# Altium PCB DAP-PCB-REV-3.PcbDoc (part 3 of 5)
Units mm, origin at the board's own origin, x right, y up, seen from the top; angles counter-clockwise.
Board outline 54.75 x 54.75 mm, 6 copper layers (L1 (SIG/PWR), L2 (GND), L3 (SIG), L4 (PWR), L5 (GND), L6 (SIG/PWR)), stack 1.65 mm thick; 309 components, 179 nets, 957 pads, 421 vias.
Unrouted connection lines stored in the file: 36.
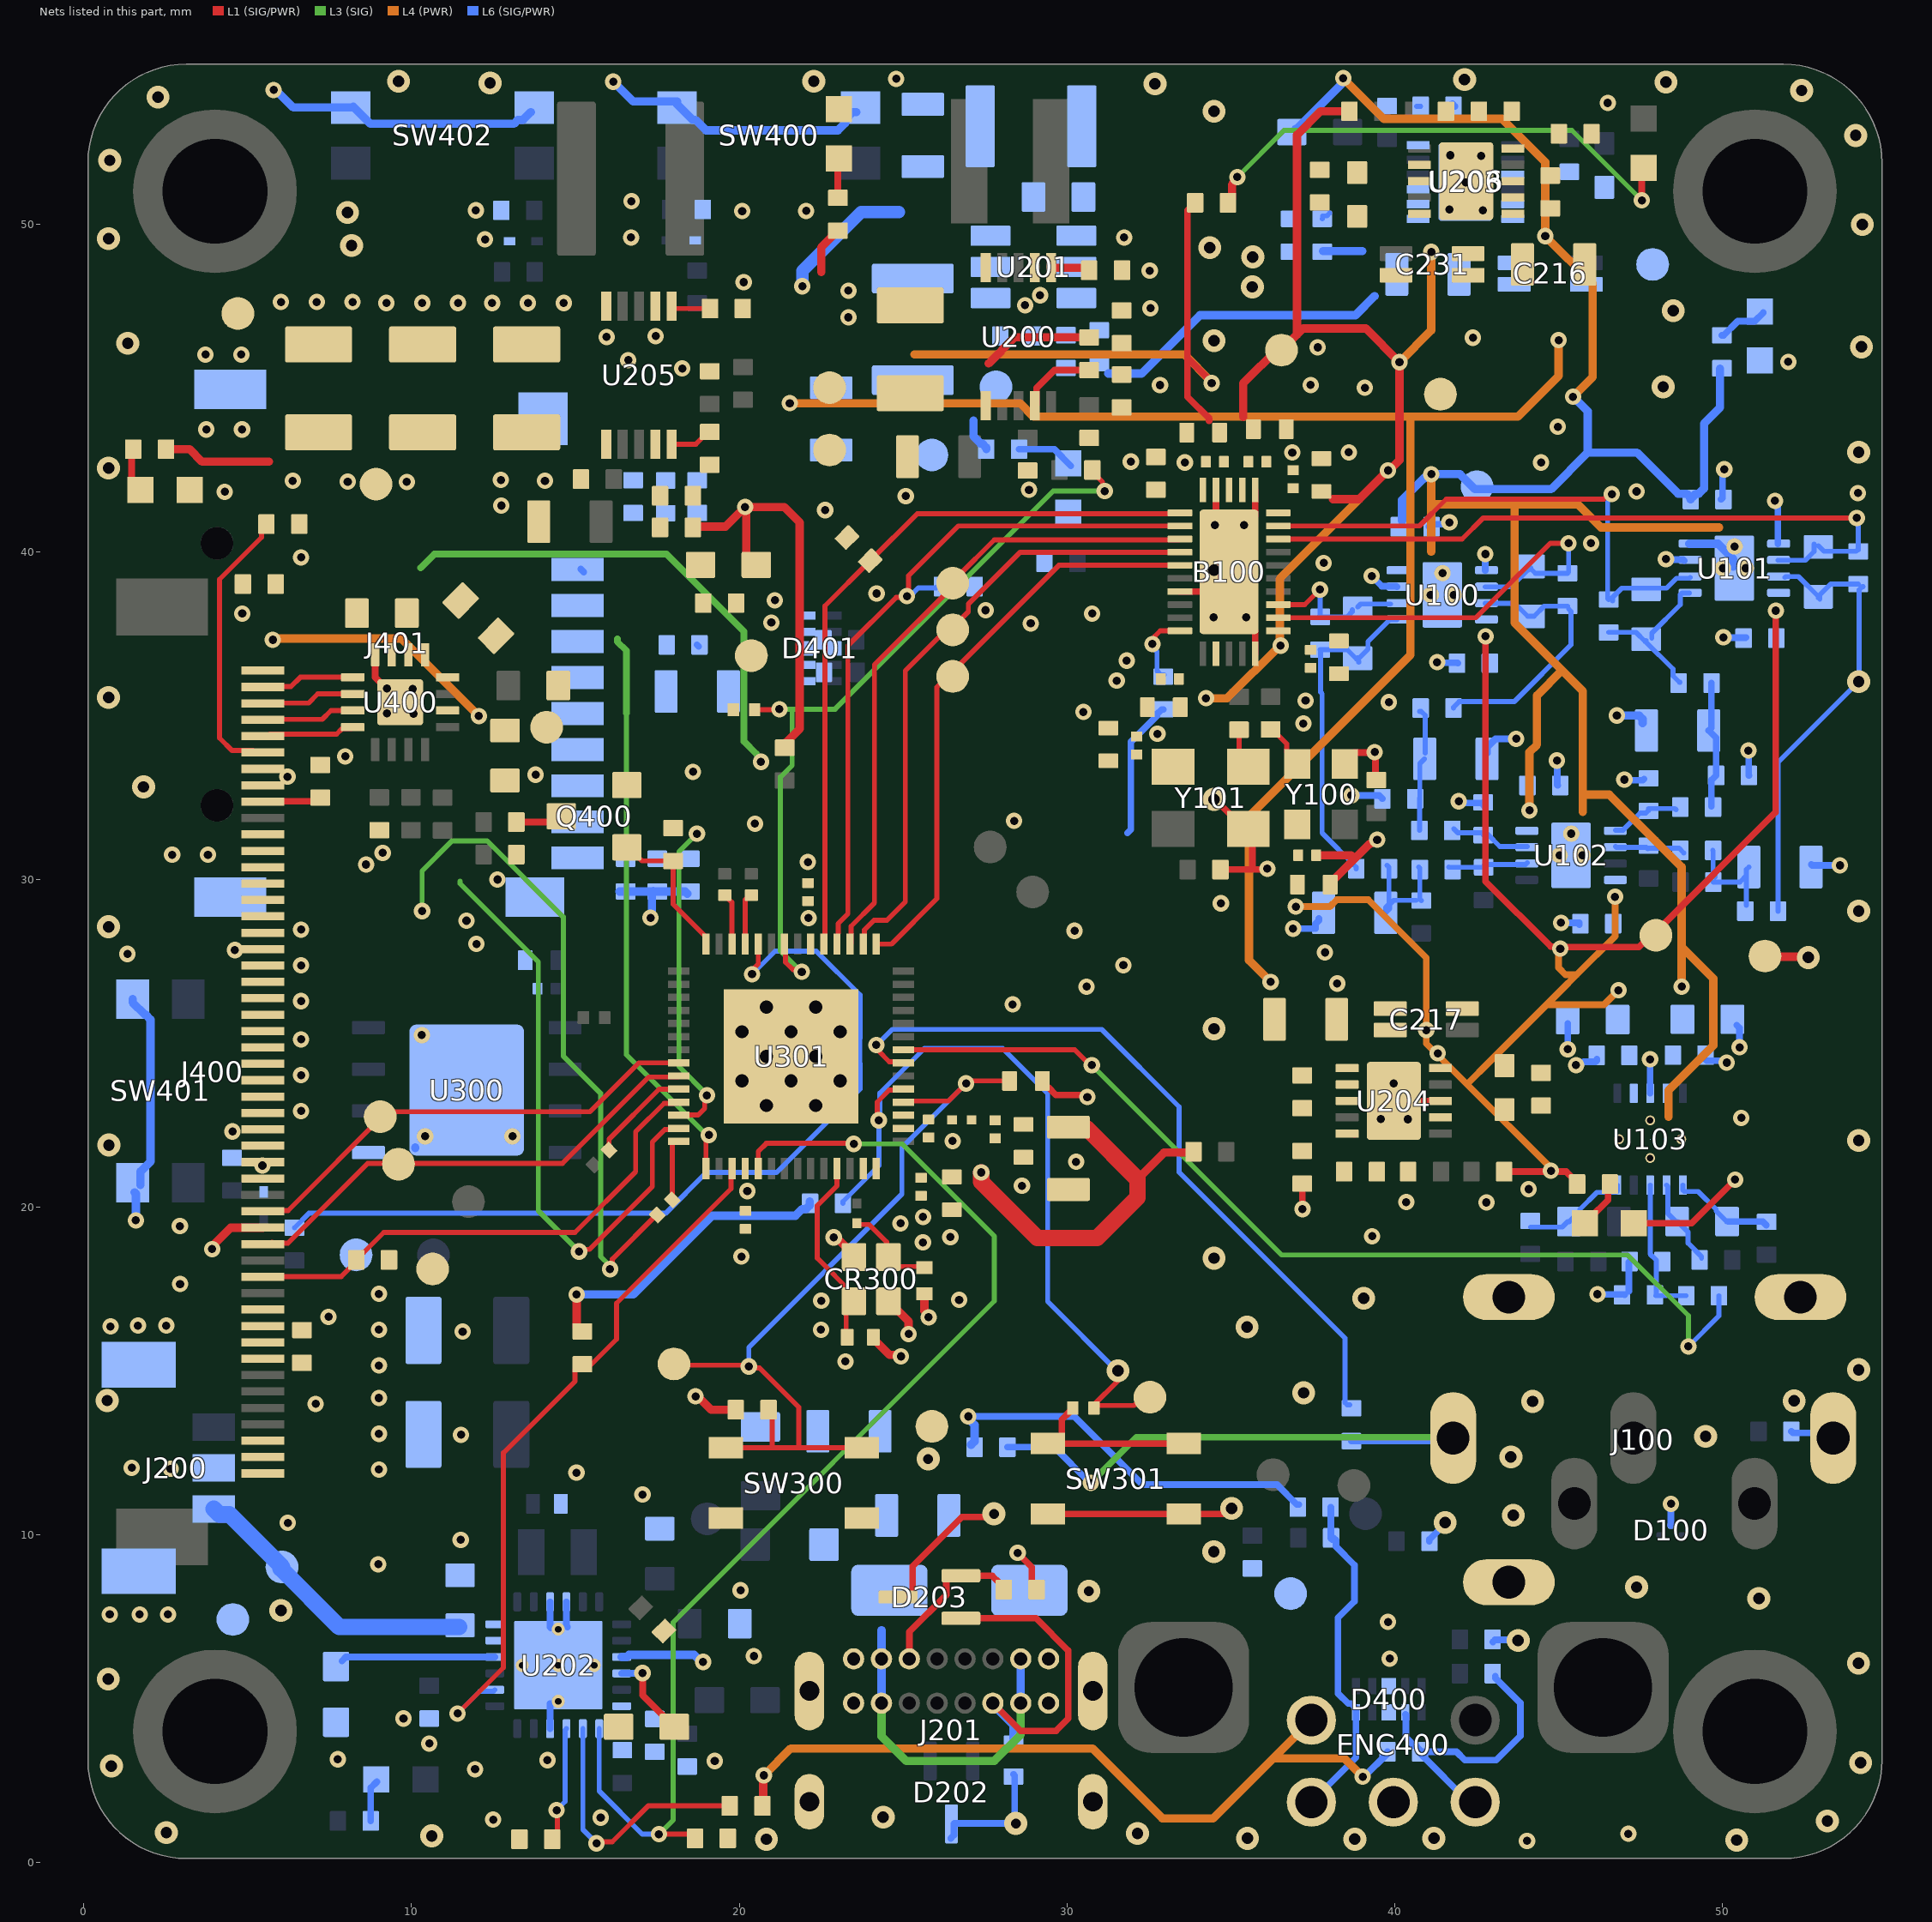
[diagram p6: the nets of this part, all layers, seen from the top]

## Part data (continued)
L201 L202: library part #1-090, <Rating>=400mA, <Tolerance>=0.2, <Value>=22uH, Manufacturer 1="Murata Electronics", Manufacturer Part Number 1=490-LQW32FT220M2HLTR, Supplier Part Number 1=490-LQW32FT220M2HLCT-ND, <Footprint>=1210, <Spec>=810mOhm, <Termination>=SMD, AL-PN=#1-090, Creator Project=DAP, Footprint Status=Verified, Lead Time="25 Weeks", Notes="No 3D", PartType=Inductor, Status=Unverified, SubType=Shielded, Supplier 1=Digikey, Supplier Label="22 µH Shielded Wirewound Inductor 300 mA 810mOhm Max 1210 (3225 Metric)", Type=Standard
L203: library part #1-151, <Rating>=2A, <Tolerance>=0.2, <Value>=1uH, Manufacturer 1="Murata Electronics", Manufacturer Part Number 1=DFE201210U-1R0M=P2, Supplier Part Number 1=490-18104-1-ND, <Spec>=95mOhm, <Termination>=SMD, AL-PN=#1-151, Creator Project=DAP, Footprint Status=Verified, Lead Time="21 Weeks", PartType=Inductor, Status=Unverified, SubType=Shielded, Supplier 1=Digikey, Supplier Label="1 µH Shielded Drum Core, Wirewound Inductor 2 A 95mOhm Max 0805 (2012 Metric)", Type=Standard
L204: library part #1-094, <Rating>=3.7A, <Tolerance>=0.2, <Value>=18uH, Manufacturer 1=Coilcraft, Manufacturer Part Number 1=XGL5050-183MEC, Supplier Part Number 1=2457-XGL5050-183MEC-ND, <Spec>=62.5mOhm, <Termination>=SMD, AL-PN=#1-094, Creator Project=DAP, Footprint Status=Verified, Lead Time=N/A, PartType=Inductor, Status=Unverified, SubType=Shielded, Supplier 1=Digikey, Supplier Label="18 µH Shielded Molded Inductor 4.5 A 62.5mOhm Max Nonstandard", Type=Standard
L300: library part #1-143, <Rating>=600mA, <Value>=2nH, Manufacturer 1="Murata Electronics", Manufacturer Part Number 1=LQP03HQ2N0B02D, Supplier Part Number 1=490-13895-1-ND, <Footprint>=0201, <Spec>=120mOhm, <Termination>=SMD, AL-PN=#1-143, Creator Project=DAP, Footprint Status=Verified, Lead Time="15 Weeks", PartType=Inductor, Status=Unverified, SubType=Shielded, Supplier 1=Digikey, Supplier Label="2 nH Unshielded Thick Film Inductor 600 mA 120mOhm Max 0201 (0603 Metric)", Type=Standard
L301: library part #1-150, <Rating>=140mA, <Tolerance>=0.03, <Value>=24nH, Manufacturer 1="Murata Electronics", Manufacturer Part Number 1=LQP03TN24NH02D, Supplier Part Number 1=490-13004-1-ND, <Footprint>=0201, <Spec>=2.3Ohm, <Termination>=SMD, AL-PN=#1-150, Creator Project=DAP, Footprint Status=Verified, Lead Time="15 Weeks", PartType=Inductor, Status=Unverified, SubType=Shielded, Supplier 1=Digikey, Supplier Label="24 nH Unshielded Thick Film Inductor 140 mA 2.3Ohm Max 0201 (0603 Metric)", Type=Standard
Q400: library part #1-130, <Rating>=2.5Vgs, <Value>=N-Type, Manufacturer 1=MCC, Manufacturer Part Number 1=2N7002-TP, Package="TO-236 MCC", Supplier Part Number 1=2N7002-TPMSCT-ND, <Termination>=SMD, AL-PN=#1-130, Check_prices=https://www.snapeda.com/parts/2N7002-TP/Micro+Commercial/view-part/?ref=eda, Creator Project=DAP, Footprint Status=Verified, Lead Time=N/A, MF="Micro Commercial", MP=2N7002-TP, PartType=Transistor, SnapEDA_Link=https://www.snapeda.com/parts/2N7002-TP/Micro+Commercial/view-part/?ref=snap, Status=Unverified, SubType=MOSFET, Supplier 1=Digikey, Supplier Label="N-Channel 60 V 115mA (Ta) 1.08W Surface Mount SOT-23", Type=Standard
R100 R101 R102 R103 R116 R117 R121 R123 R131 R134: library part #1-105, <Rating>=1/16W, <Tolerance>=0.001, <Value>=499Ohm, Manufacturer 1=YAGEO, Manufacturer Part Number 1=RT0402BRD07499RL, Supplier Part Number 1=YAG1440CT-ND, <Footprint>=0402, <Termination>=SMD, AL-PN=#1-105, Creator Project=DAP, Footprint Status=Verified, Lead Time="23 Weeks", PartType=Resistor, Status=Unverified, Supplier 1=Digikey, Supplier Label="499 Ohms ±0.1% 0.063W, 1/16W Chip Resistor 0402 (1005 Metric) Thin Film", Type=Standard
R104 R105: library part #1-102, <Rating>=1/16W, <Tolerance>=0.01, <Value>=22Ohm, Manufacturer 1=YAGEO, Manufacturer Part Number 1=RC0402FR-0722RL, Supplier Part Number 1=311-22.0LRCT-ND, <Footprint>=0402, <Termination>=SMD, AL-PN=#1-102, Creator Project=DAP, Footprint Status=Verified, Lead Time="22 Weeks", PartType=Resistor, Status=Unverified, Supplier 1=Digikey, Supplier Label="22 Ohms ±1% 0.063W, 1/16W Chip Resistor 0402 (1005 Metric) Moisture Resistant Thick Film", Type=Standard
R106 R107 R111 R112 R113 R119 R129 R135 R208 R209 R210 R211 R216 R221 R223 R242 R300 R301 R400 R401 R402 R403 R404 R405 R406 R407 R408 R412 R413 R414 R415 R416 R417 R418 R419 R422: library part #1-134, <Tolerance>=0.01, <Value>=10kOhm, Manufacturer 1=YAGEO, Manufacturer Part Number 1=AC0402FR-0710KL, Supplier Part Number 1=YAG3436CT-ND, <Footprint>=0402, <Termination>=SMD, AL-PN=#1-134, Creator Project=DAP, Footprint Status=Verified, Lead Time="22 Weeks", PartType=Resistor, Status=Unverified, Supplier 1=Digikey, Supplier Label="10 kOhms ±1% 0.063W, 1/16W Chip Resistor 0402 (1005 Metric) Automotive AEC-Q200, Moisture Resistant Thick Film", Type=Standard
R108 R207 R226 R231 R238 R247: library part #1-138, <Tolerance>=0.001, <Value>=49.9kOhm, Manufacturer 1=YAGEO, Manufacturer Part Number 1=RT0402BRD0749K9L, Supplier Part Number 1=YAG4270CT-ND, <Footprint>=0402, <Termination>=SMD, AL-PN=#1-138, Creator Project=DAP, Footprint Status=Verified, Lead Time="23 Weeks", PartType=Resistor, Status=Unverified, Supplier 1=Digikey, Supplier Label="49.9 kOhms ±0.1% 0.063W, 1/16W Chip Resistor 0402 (1005 Metric) Thin Film", Type=Standard
R114 R115 R126 R133: library part #1-109, <Rating>=1/16W, <Tolerance>=0.001, <Value>=220Ohm, Manufacturer 1=YAGEO, Manufacturer Part Number 1=RT0402BRD07220RL, Supplier Part Number 1=YAG4207CT-ND, <Footprint>=0402, <Termination>=SMD, AL-PN=#1-109, Creator Project=DAP, Footprint Status=Verified, Lead Time="23 Weeks", PartType=Resistor, Status=Unverified, Supplier 1=Digikey, Supplier Label="220 Ohms ±0.1% 0.063W, 1/16W Chip Resistor 0402 (1005 Metric) Thin Film", Type=Standard
R118 R204 R205 R212 R228 R239 R240 R241 R245 R420 R421 R424 R425: library part #1-131, <Tolerance>=0.01, <Value>=100kOhm, Manufacturer 1=YAGEO, Manufacturer Part Number 1=RT0402BRD07100KL, Supplier Part Number 1=YAG1343CT-ND, <Footprint>=0402, <Termination>=SMD, AL-PN=#1-131, Creator Project=DAP, Footprint Status=Verified, Lead Time="23 Weeks", PartType=Resistor, Status=Unverified, Supplier 1=Digikey, Supplier Label="100 kOhms ±0.1% 0.063W, 1/16W Chip Resistor 0402 (1005 Metric) Thin Film", Type=Standard
R120 R122 R124 R132: library part #1-110, <Rating>=1/16W, <Tolerance>=0.001, <Value>=681Ohm, Manufacturer 1=YAGEO, Manufacturer Part Number 1=RT0402BRD07681RL, Supplier Part Number 1=YAG1466CT-ND, <Footprint>=0402, <Termination>=SMD, AL-PN=#1-110, Creator Project=DAP, Footprint Status=Verified, Lead Time="23 Weeks", PartType=Resistor, Status=Unverified, Supplier 1=Digikey, Supplier Label="681 Ohms ±0.1% 0.063W, 1/16W Chip Resistor 0402 (1005 Metric) Thin Film", Type=Standard
R125 R127: library part #1-113, <Rating>=1/16W, <Tolerance>=0.001, <Value>=4.7Ohm, Manufacturer 1=YAGEO, Manufacturer Part Number 1=RT0402BRE074R7L, Supplier Part Number 1=13-RT0402BRE074R7LCT-ND, <Footprint>=0402, <Termination>=SMD, AL-PN=#1-113, Creator Project=DAP, Footprint Status=Verified, Lead Time="23 Weeks", PartType=Resistor, Status=Unverified, Supplier 1=Digikey, Supplier Label="4.7 Ohms ±0.1% 0.063W, 1/16W Chip Resistor 0402 (1005 Metric) Thin Film", Type=Standard
R128 R203 R237: library part #1-079, <Rating>=1/16W, <Tolerance>=0.001, <Value>=54.9kOhm, Manufacturer 1=YAGEO, Manufacturer Part Number 1=RT0402BRD0754K9L, Supplier Part Number 1=YAG1452CT-ND, <Footprint>=0402, <Termination>=SMD, AL-PN=#1-079, Creator Project=DAP, Footprint Status=Verified, Lead Time="20 Weeks", PartType=Resistor, Status=Unverified, Supplier 1=Digikey, Supplier Label="54.9 kOhms ±0.1% 0.063W, 1/16W Chip Resistor 0402 (1005 Metric) Thin Film", Type=Standard
R200: library part #1-074, <Rating>=1/16W, <Tolerance>=0.001, <Value>=220kOhm, Manufacturer 1=YAGEO, Manufacturer Part Number 1=RC0402BR-07220KL, Supplier Part Number 1=13-RC0402BR-07220KLCT-ND, <Footprint>=0402, <Termination>=SMD, AL-PN=#1-074, Creator Project=DAP, Footprint Status=Verified, Lead Time="17 Weeks", PartType=Resistor, Status=Unverified, Supplier 1=Digikey, Supplier Label="220 kOhms ±0.1% 0.063W, 1/16W Chip Resistor 0402 (1005 Metric) Moisture Resistant Thick Film", Type=Standard
R201: library part #1-091, <Rating>=1/16W, <Tolerance>=0.001, <Value>=309kOhm, Manufacturer 1=YAGEO, Manufacturer Part Number 1=RE0402BRE07309KL, Supplier Part Number 1=13-RE0402BRE07309KLCT-ND, <Footprint>=0402, <Termination>=SMD, AL-PN=#1-091, Creator Project=DAP, Footprint Status=Verified, Lead Time="20 Weeks", PartType=Resistor, Status=Unverified, Supplier 1=Digikey, Supplier Label="309 kOhms ±0.1% 0.063W, 1/16W Chip Resistor 0402 (1005 Metric) Thick Film", Type=Standard
R202: library part #1-067, <Rating>=0.1W, <Tolerance>=0.005, <Value>=274kOhm, Manufacturer 1=YAGEO, Manufacturer Part Number 1=RT0603DRE07274KL, Supplier Part Number 1=13-RT0603DRE07274KLCT-ND, <Footprint>=0603, <Termination>=SMD, AL-PN=#1-067, Creator Project=DAP, Footprint Status=Verified, Lead Time="20 Weeks", PartType=Resistor, Status=Unverified, Supplier 1=Digikey, Supplier Label="RES SMD 274K OHM 0.5% 1/10W 0603", Type=Standard
R206 R229 R246 R249 R250 R251 R252 R253 R409 R410 R411: library part #1-043, <Rating>=1/16W, <Tolerance>=0.001, <Value>=1kOhm, Manufacturer 1=YAGEO, Manufacturer Part Number 1=RT0402BRD071KL, Supplier Part Number 1=YAG1386TR-ND, <Footprint>=0402, <Termination>=SMD, AL-PN=#1-043, Creator Project=aRTy, Footprint Status=Verified, Lead Time="20 Weeks", PartType=Resistor, Status=Unverified, Supplier 1=Digikey, Supplier Label="1 kOhms ±0.1% 0.063W, 1/16W Chip Resistor 0402 (1005 Metric) Thin Film", Type=Standard
R213 R224: library part #1-078, <Rating>=1/16W, <Tolerance>=0.001, <Value>=15kOhm, Manufacturer 1=YAGEO, Manufacturer Part Number 1=RT0402BRD0715KL, Supplier Part Number 1=YAG2302CT-ND, <Footprint>=0402, <Termination>=SMD, AL-PN=#1-078, Creator Project=DAP, Footprint Status=Verified, Lead Time="20 Weeks", PartType=Resistor, Status=Unverified, Supplier 1=Digikey, Supplier Label="15 kOhms ±0.1% 0.063W, 1/16W Chip Resistor 0402 (1005 Metric) Thin Film", Type=Standard
R214: library part #1-060, <Rating>=1/16W, <Tolerance>=0.01, <Value>=5kOhm, Manufacturer 1=YAGEO, Manufacturer Part Number 1=RC0402FR-075KL, Supplier Part Number 1=13-RC0402FR-075KLCT-ND, <Footprint>=0402, <Termination>=SMD, AL-PN=#1-060, Creator Project=DAP, Footprint Status=Verified, Lead Time="17 Weeks", PartType=Resistor, Status=Unverified, Supplier 1=Digikey, Supplier Label="5 kOhms ±1% 0.063W, 1/16W Chip Resistor 0402 (1005 Metric) Moisture Resistant Thick Film", Type=Standard
R215: library part #1-061, <Rating>=1/16W, <Tolerance>=0.005, <Value>=9.88kOhm, Manufacturer 1=YAGEO, Manufacturer Part Number 1=RT0402DRD079K88L, Supplier Part Number 1=311-2214-1-ND, <Footprint>=0402, <Termination>=SMD, AL-PN=#1-061, Creator Project=DAP, Footprint Status=Verified, Lead Time="20 Weeks", PartType=Resistor, Status=Unverified, Supplier 1=Digikey, Supplier Label="9.88 kOhms ±0.5% 0.063W, 1/16W Chip Resistor 0402 (1005 Metric) Thin Film", Type=Standard
R217: library part #1-065, <Rating>=0.1W, <Tolerance>=0.01, <Value>=270Ohm, Manufacturer 1=YAGEO, Manufacturer Part Number 1=RC0603FR-07270RL, Supplier Part Number 1=311-270HRCT-ND, <Footprint>=0603, <Termination>=SMD, AL-PN=#1-065, Creator Project=DAP, Footprint Status=Verified, Lead Time="17 Weeks", PartType=Resistor, Status=Unverified, Supplier 1=Digikey, Supplier Label="270 Ohms ±1% 0.1W, 1/10W Chip Resistor 0603 (1608 Metric) Moisture Resistant Thick Film", Type=Standard
R218: library part #1-064, <Rating>=0.1W, <Tolerance>=0.001, <Value>=500Ohm, Manufacturer 1=YAGEO, Manufacturer Part Number 1=RT0603BRC07500RL, Supplier Part Number 1=13-RT0603BRC07500RLCT-ND, <Footprint>=0603, <Termination>=SMD, AL-PN=#1-064, Creator Project=DAP, Footprint Status=Verified, Lead Time="20 Weeks", PartType=Resistor, Status=Unverified, Supplier 1=Digikey, Supplier Label="500 Ohms ±0.1% 0.1W, 1/10W Chip Resistor 0603 (1608 Metric) Thin Film", Type=Standard
R219: library part #1-087, <Rating>=1/16W, <Tolerance>=0.01, <Value>=88.7kOhm, Manufacturer 1=YAGEO, Manufacturer Part Number 1=RC0402FR-0788K7L, Supplier Part Number 1=311-88.7KLRCT-ND, <Footprint>=0402, <Termination>=SMD, AL-PN=#1-087, Creator Project=DAP, Footprint Status=Verified, Lead Time="17 Weeks", PartType=Resistor, Status=Unverified, Supplier 1=Digikey, Supplier Label="88.7 kOhms ±1% 0.063W, 1/16W Chip Resistor 0402 (1005 Metric) Moisture Resistant Thick Film", Type=Standard
R220: library part #1-086, <Rating>=1/10W, <Tolerance>=0.001, <Value>=135kOhm, Manufacturer 1=YAGEO, Manufacturer Part Number 1=RT0603BRD07135KL, Supplier Part Number 1=13-RT0603BRD07135KLCT-ND, <Footprint>=0603, <Termination>=SMD, AL-PN=#1-086, Creator Project=DAP, Footprint Status=Verified, Lead Time="20 Weeks", PartType=Resistor, Status=Unverified, Supplier 1=Digikey, Supplier Label="135 kOhms ±0.1% 0.1W, 1/10W Chip Resistor 0603 (1608 Metric) Thin Film", Type=Standard
R222 R243: library part #1-083, <Rating>=1/16W, <Tolerance>=0.01, <Value>=909kOhm, Manufacturer 1=YAGEO, Manufacturer Part Number 1=RC0402FR-07909KL, Supplier Part Number 1=YAG2377CT-ND, <Footprint>=0402, <Termination>=SMD, AL-PN=#1-083, Creator Project=DAP, Footprint Status=Verified, Lead Time="17 Weeks", PartType=Resistor, Status=Unverified, Supplier 1=Digikey, Supplier Label="909 kOhms ±1% 0.063W, 1/16W Chip Resistor 0402 (1005 Metric) Moisture Resistant Thick Film", Type=Standard
R225 R244: library part #1-084, <Rating>=1/16W, <Tolerance>=0.001, <Value>=90.9kOhm, Manufacturer 1=YAGEO, Manufacturer Part Number 1=RT0402BRD0790K9L, Supplier Part Number 1=YAG1489CT-ND, <Footprint>=0402, <Termination>=SMD, AL-PN=#1-084, Creator Project=DAP, Footprint Status=Verified, Lead Time="20 Weeks", PartType=Resistor, Status=Unverified, Supplier 1=Digikey, Supplier Label="90.9 kOhms ±0.1% 0.063W, 1/16W Chip Resistor 0402 (1005 Metric) Thin Film", Type=Standard
R227: library part #1-149, <Rating>=1/4W, <Tolerance>=0.01, <Value>=0.5Ohms, Manufacturer 1=YAGEO, Manufacturer Part Number 1=PT0805FR-7W0R5L, Supplier Part Number 1=13-PT0805FR-7W0R5LCT-ND, <Footprint>=0805, <Termination>=SMD, AL-PN=#1-149, Creator Project=DAP, Footprint Status=Verified, Lead Time="20 Weeks", PartType=Resistor, Status=Unverified, Supplier 1=Digikey, Supplier Label="500 mOhms ±1% 0.25W, 1/4W Chip Resistor 0805 (2012 Metric) Automotive AEC-Q200, Current Sense, Moisture Resistant Thick Film", Type=Standard
R230: library part #1-088, <Rating>=1/16W, <Tolerance>=0.01, <Value>=15.4kOhm, Manufacturer 1=YAGEO, Manufacturer Part Number 1=RT0402BRD0715K4L, Supplier Part Number 1=YAG4177CT-ND, <Footprint>=0402, <Termination>=SMD, AL-PN=#1-088, Creator Project=DAP, Footprint Status=Verified, Lead Time="20 Weeks", PartType=Resistor, Status=Unverified, Supplier 1=Digikey, Supplier Label="15.4 kOhms ±0.1% 0.063W, 1/16W Chip Resistor 0402 (1005 Metric) Thin Film", Type=Standard
R232 R233 R248: library part #1-085, <Rating>=1/16W, <Tolerance>=0.001, <Value>=33.2kOhm, Manufacturer 1=YAGEO, Manufacturer Part Number 1=RT0402BRD0733K2L, Supplier Part Number 1=YAG4244CT-ND, <Footprint>=0402, <Termination>=SMD, AL-PN=#1-085, Creator Project=DAP, Footprint Status=Verified, Lead Time="20 Weeks", PartType=Resistor, Status=Unverified, Supplier 1=Digikey, Supplier Label="33.2 kOhms ±0.1% 0.063W, 1/16W Chip Resistor 0402 (1005 Metric) Thin Film", Type=Standard
R234 R235: library part #1-024, <Rating>=1/16W, <Tolerance>=0.001, <Value>=5.1kOhm, Manufacturer 1=YAGEO, Manufacturer Part Number 1=RT0402BRE075K1L, Supplier Part Number 1=YAG4404TR-ND, <Footprint>=0402, <Termination>=SMD, AL-PN=#1-024, Creator Project=aRTy, Footprint Status=Verified, Lead Time="20 Weeks", PartType=Resistor, Status=Unverified, Supplier 1=Digikey, Supplier Label="5.1 kOhms ±0.1% 0.063W, 1/16W Chip Resistor 0402 (1005 Metric) Thin Film", Type=Standard
R236: library part #1-095, <Rating>=1/10W, <Tolerance>=0.001, <Value>=172kOhm, Manufacturer 1=YAGEO, Manufacturer Part Number 1=RT0603BRD07172KL, Supplier Part Number 1=13-RT0603BRD07172KLCT-ND, <Footprint>=0603, <Termination>=SMD, AL-PN=#1-095, Creator Project=DAP, Footprint Status=Verified, Lead Time="20 Weeks", PartType=Resistor, Status=Unverified, Supplier 1=Digikey, Supplier Label="172 kOhms ±0.1% 0.1W, 1/10W Chip Resistor 0603 (1608 Metric) Thin Film", Type=Standard
R302: library part #1-147, <Rating>=1/20W, <Tolerance>=0.01, <Value>=1kOhm, Manufacturer 1=YAGEO, Manufacturer Part Number 1=RC0201FR-071KL, Supplier Part Number 1=311-1KMCT-ND, <Footprint>=0201, <Termination>=SMD, AL-PN=#1-147, Creator Project=DAP, Footprint Status=Verified, Lead Time="24 Weeks", PartType=Resistor, Status=Unverified, Supplier 1=Digikey, Supplier Label="1 kOhms ±1% 0.05W, 1/20W Chip Resistor 0201 (0603 Metric) Moisture Resistant Thick Film", Type=Standard
R303: library part #1-148, <Rating>=1/20W, <Tolerance>=0.01, <Value>=1MOhm, Manufacturer 1=YAGEO, Manufacturer Part Number 1=RC0201FR-071ML, Supplier Part Number 1=311-1MMCT-ND, <Footprint>=0201, <Termination>=SMD, AL-PN=#1-148, Creator Project=DAP, Footprint Status=Verified, Lead Time="24 Weeks", PartType=Resistor, Status=Unverified, Supplier 1=Digikey, Supplier Label="1 MOhms ±1% 0.05W, 1/20W Chip Resistor 0201 (0603 Metric) Moisture Resistant Thick Film", Type=Standard
R304 R305 R306 R307 R308: library part #1-146, <Rating>=1/20W, <Tolerance>=0.01, <Value>=22Ohm, Manufacturer 1=YAGEO, Manufacturer Part Number 1=RC0201FR-0722RL, Supplier Part Number 1=YAG2518CT-ND, <Footprint>=0201, <Termination>=SMD, AL-PN=#1-146, Creator Project=DAP, Footprint Status=Verified, Lead Time="24 Weeks", PartType=Resistor, Status=Unverified, Supplier 1=Digikey, Supplier Label="22 Ohms ±1% 0.05W, 1/20W Chip Resistor 0201 (0603 Metric) Moisture Resistant Thick Film", Type=Standard
R423: library part #1-133, <Tolerance>=0.01, <Value>=32.4kOhm, Manufacturer 1=YAGEO, Manufacturer Part Number 1=RC0402FR-0732K4L, Supplier Part Number 1=YAG3119CT-ND, <Footprint>=0402, <Termination>=SMD, AL-PN=#1-133, Creator Project=DAP, Footprint Status=Verified, Lead Time="22 Weeks", PartType=Resistor, Status=Unverified, Supplier 1=Digikey, Supplier Label="32.4 kOhms ±1% 0.063W, 1/16W Chip Resistor 0402 (1005 Metric) Moisture Resistant Thick Film", Type=Standard
SW300 SW301: library part #1-115, <Value>=SPST, Manufacturer 1=C&K, Manufacturer Part Number 1="PTS810SJM250SMTR LFS", Package=None, Supplier Part Number 1=CKN10502CT-ND, <Footprint>=Vert, <Termination>=SMD, AL-PN=#1-115, Check_prices=https://www.snapeda.com/parts/PTS810%20SJM%20250%20SMTR%20LFS/C%2526K/view-part/?ref=eda, Creator Project=DAP, Footprint Status=Verified, Lead Time="16 Weeks", MF=C&K, MP="PTS810 SJM 250 SMTR LFS", PartType=Switch, SnapEDA_Link=https://www.snapeda.com/parts/PTS810%20SJM%20250%20SMTR%20LFS/C%2526K/view-part/?ref=snap, Status=Unverified, SubType=Tacticle, Supplier 1=Digikey, Supplier Label="Tactile Switch SPST-NO Top Actuated Surface Mount", Type=Standard
SW400 SW401 SW402: library part #1-114, <Value>=SPST, Manufacturer 1=E-Switch, Manufacturer Part Number 1=TL1014BF220QG, Supplier Part Number 1=141-TL1014BF220QGCT-ND, <Footprint>=R/A, <Termination>=SMD, AL-PN=#1-114, Creator Project=DAP, Footprint Status=Verified, Lead Time="7 Weeks", PartType=Switch, Status=Unverified, SubType=Tacticle, Supplier 1=Digikey, Supplier Label="Tactile Switch SPST-NO Side Actuated Surface Mount, Right Angle", Type=Standard
U100 U101 U102: library part #1-104, Manufacturer 1="Texas Instruments", Manufacturer Part Number 1=OPA1612AIDRGR, Supplier Part Number 1=296-38367-1-ND, <Termination>=SMD, AL-PN=#1-104, Creator Project=DAP, Footprint Status=Verified, Lead Time="16 Weeks", PartType=IC, Status=Unverified, SubType=Op-Amp, Supplier 1=Digikey, Supplier Label="Audio Amplifier 2 Circuit Rail-to-Rail 8-SON (3x3)", Type=Standard
U103: library part #1-056, Manufacturer 1="Texas Instruments", Manufacturer Part Number 1=OPA1622IDRCR, Package="VSON-10 Texas Instruments", Supplier Part Number 1=296-45038-1-ND, <Termination>=SMD, AL-PN=#1-056, Check_prices=https://www.snapeda.com/parts/OPA1622IDRCR/Texas+Instruments/view-part/?ref=eda, Creator Project=DAP, Footprint Status=Verified, Lead Time="16 Weeks", MF="Texas Instruments", MP=OPA1622IDRCR, PartType=IC, SnapEDA_Link=https://www.snapeda.com/parts/OPA1622IDRCR/Texas+Instruments/view-part/?ref=snap, Status=Unverified, SubType=Op-Amp, Supplier 1=Digikey, Supplier Label="Audio Amplifier 2 Circuit 10-VSON (3x3)", Type=Standard
U200 U205: library part #1-050, Manufacturer 1="Analog Devices", Manufacturer Part Number 1=LTC3440EMS#TRPBF, Package="MSOP-10 Linear Technology", Supplier Part Number 1=LTC3440EMS#TRPBFCT-ND, <Termination>=SMD, AL-PN=#1-050, Check_prices=https://www.snapeda.com/parts/LTC3440EMS%23TRPBF/Analog+Devices/view-part/?ref=eda, Creator Project=DAP, Footprint Status=Verified, Lead Time="21 Weeks", MF="Analog Devices", MP=LTC3440EMS#TRPBF, PartType=IC, SnapEDA_Link=https://www.snapeda.com/parts/LTC3440EMS%23TRPBF/Analog+Devices/view-part/?ref=snap, Status=Unverified, SubType=Buck-Boost, Supplier 1=Digikey, Supplier Label="Buck-Boost Switching Regulator IC Positive Adjustable 2.5V 1 Output 600mA 10-TFSOP, 10-MSOP (0.118\", 3.00mm Width)", Type=Standard
U201: library part #1-089, Manufacturer 1="Analog Devices", Manufacturer Part Number 1=LT3462AES6#TRPBF, Manufacturer_Name="Analog Devices Inc", Manufacturer_Part_Number=LT3093EDD#TRPBF, Supplier Part Number 1=LT3462AES6#TRPBFCT-ND, <Termination>=SMD, AL-PN=#1-089, Copyright="Copyright (C) 2026 Ultra Librarian. All rights reserved.", Creator Project=DAP, Footprint Status=Verified, Lead Time="10 Weeks", PartType=IC, RefDes=RefDes, Status=Unverified, SubType=Regulator, Supplier 1=Digikey, Supplier Label="Cuk Switching Regulator IC Negative Adjustable -1.265V 1 Output 250mA SOT-23-6 Thin, TSOT-23-6", Type=Standard
U202: library part #1-054, Manufacturer 1="Texas Instruments", Manufacturer Part Number 1=BQ24250RGET, Package="VQFN-24 Texas Instruments", Supplier Part Number 1=296-36180-1-ND, <Termination>=SMD, AL-PN=#1-054, Check_prices=https://www.snapeda.com/parts/BQ24250RGET/Texas+Instruments/view-part/?ref=eda, Creator Project=DAP, Footprint Status=Verified, Lead Time="16 Weeks", MF="Texas Instruments", MP=BQ24250RGET, PartType=IC, SnapEDA_Link=https://www.snapeda.com/parts/BQ24250RGET/Texas+Instruments/view-part/?ref=snap, Status=Unverified, SubType=Charger, Supplier 1=Digikey, Supplier Label="Charger IC Lithium Ion 24-VQFN (4x4)", Type=Standard
U203: library part #1-052, Manufacturer 1="Analog Devices", Manufacturer Part Number 1=LT3093EDD#TRPBF, Manufacturer_Name="Analog Devices Inc", Supplier Part Number 1=505-LT3093EDD#TRPBFCT-ND, <Termination>=SMD, AL-PN=#1-052, Copyright="Copyright (C) 2026 Ultra Librarian. All rights reserved.", Creator Project=DAP, Footprint Status=Verified, Lead Time="21 Weeks", Manufacturer_Part_Number=LT3093EDD#TRPBF, PartType=IC, RefDes=RefDes, Status=Unverified, SubType=LDO, Supplier 1=Digikey, Supplier Label="Linear Voltage Regulator IC Negative Adjustable 1 Output 200mA 12-DFN (3x3)", Type=Standard
U204 U206: library part #1-051, Manufacturer 1="Analog Devices", Manufacturer Part Number 1=LT3042EDD#PBF, Package="DFN-10 Linear Technology", Supplier Part Number 1=505-LT3042EDD#PBF-ND, <Termination>=SMD, AL-PN=#1-051, Check_prices=https://www.snapeda.com/parts/LT3042EDD%23PBF/Analog+Devices/view-part/?ref=eda, Creator Project=DAP, Footprint Status=Verified, Lead Time="21 Weeks", MF="Analog Devices", MP=LT3042EDD#PBF, PartType=IC, SnapEDA_Link=https://www.snapeda.com/parts/LT3042EDD%23PBF/Analog+Devices/view-part/?ref=snap, Status=Unverified, SubType=LDO, Supplier 1=Digikey, Supplier Label="Linear Voltage Regulator IC Positive Adjustable 1 Output 200mA 10-DFN (3x3)", Type=Standard
U300: library part #1-124, <Rating>=133MHz, <Value>=64Bit, Manufacturer 1="Gigadevice Electronics Singapore PTE.LTD.", Manufacturer Part Number 1=GD25B64EWIGR, Supplier Part Number 1=1970-GD25B64EWIGRCT-ND, <Termination>=SMD, AL-PN=#1-124, Creator Project=DAP, Footprint Status=Verified, Lead Time=N/A, PartType=IC, Status=Unverified, SubType=FLASH, Supplier 1=Digikey, Supplier Label="FLASH - NOR (SLC) Memory IC 64Mbit SPI - Quad I/O 133 MHz 7 ns 8-WSON (5x6)", Type=Standard
U301: library part #1-055, Manufacturer 1="Espressif Technologies", Package=None, Supplier Part Number 1=1965-ESP32-S3-ND, <Termination>=SMD, AL-PN=#1-055, Availability="In Stock", Check_prices=https://www.snapeda.com/parts/ESP32-S3/Espressif+Systems/view-part/?ref=eda, Creator Project=DAP, Footprint Status=Verified, Lead Time="8 Weeks", Manufacturer Part Number 1=ESP32-S3, MF="Espressif Systems", MP=ESP32-S3, PartType=MCU, Price=None, Purchase-URL=https://pricing.snapeda.com/search/part/ESP32-S3/?ref=eda, SnapEDA_Link=https://www.snapeda.com/parts/ESP32-S3/Espressif+Systems/view-part/?ref=snap, Status=Unverified, SubType=ESP-32, Supplier 1=Digikey, Supplier Label="IC RF TxRx + MCU Bluetooth, WiFi 802.11b/g/n, Bluetooth v5.0 2.412GHz ~ 2.484GHz 56-VFQFN Exposed Pad", Type=Standard
U400: library part #1-128, Manufacturer 1="Rohm Semiconductor", Manufacturer Part Number 1=BD1604MUV-E2, Manufacturer_Name="ROHM Semiconductor", Supplier Part Number 1=BD1604MUV-E2CT-ND, <Termination>=SMD, AL-PN=#1-128, Copyright="Copyright (C) 2025 Ultra Librarian. All rights reserved.", Creator Project=DAP, Footprint Status=Verified, Lead Time="12 Weeks", Manufacturer_Part_Number=BD1604MUV-E2, Notes="Very slightly off", PartType=IC, RefDes=RefDes, Status=Unverified, SubType="LED Driver", Supplier 1=Digikey, Supplier Label="LED Driver IC 4 Output DC DC Regulator Switched Capacitor (Charge Pump) Dimming 30mA VQFN016V3030", Type=Standard
Y100: library part #1-100, <Rating>=2.2mA, <Value>=22.5792MHz, Manufacturer 1="ECS Inc.", Manufacturer Part Number 1=ECS-2520MVLC-225.792-CN-TR, Package=None, Supplier Part Number 1=50-ECS-2520MVLC-225.792-CN-TRCT-ND, <Termination>=SMD, AL-PN=#1-100, Availability=Unavailable, Creator Project=DAP, Footprint Status=Verified, Lead Time="19 Weeks", MP=ASTX-H11-24.576MHZ-T, PartType=Oscillator, Price=None, Status=Unverified, SubType=Crystal, Supplier 1=Digikey, Supplier Label="22.5792 MHz XO (Standard) CMOS Oscillator 1.6V ~ 3.6V Enable/Disable 4-SMD, No Lead", Type=Standard
Y101: library part #1-101, <Rating>=5.5mA, <Value>=24.576MHz, Manufacturer 1="Abracon LLC", Manufacturer Part Number 1=ASTX-H11-24.576MHZ-T, Package=None, Supplier Part Number 1=535-12038-1-ND, <Termination>=SMD, AL-PN=#1-101, Availability=Unavailable, Creator Project=DAP, Footprint Status=Verified, Lead Time="16 Weeks", MP=ASTX-H11-24.576MHZ-T, PartType=Oscillator, Price=None, Status=Unverified, SubType=Crystal, Supplier 1=Digikey, Supplier Label="24.576 MHz TCXO HCMOS Oscillator 3.3V Enable/Disable 4-SMD, No Lead", Type=Standard

## Free pads (board coordinates)
  round 5 hole 3.2: ""(4,4) ""(4,51) ""(51,4) ""(51,51)

## Via types
v1: diameter 0.5, hole 0.25, L1 (SIG/PWR) to L6 (SIG/PWR), tented both sides, 335 vias
v2: diameter 0.7, hole 0.35, L1 (SIG/PWR) to L6 (SIG/PWR), tented both sides, 69 vias
v3: diameter 0.7, hole 0.3, L1 (SIG/PWR) to L6 (SIG/PWR), tented both sides, 6 vias
v4: diameter 1.25, hole 0.75, L1 (SIG/PWR) to L6 (SIG/PWR), 6 vias
v5: diameter 0.4/0.4/0.4/0.4/0.4/0.4 (per signal layer), hole 0.2, L1 (SIG/PWR) to L6 (SIG/PWR), tented both sides, 5 vias

## Nets (pads, with @x,y where several pads share a name; then routed paths per layer and width w, separated by ;. In a path a pad name is that pad's centre, name@x,y a point inside that pad or via, vN(x,y) a via of type N, cw(c..) or ccw(c..) an arc to the next point about the centre after c; other vN are vias at no path point)
22.5792_OUT: R104.1 Y100.3 | length 1.3
  L1 (SIG/PWR) w0.152: R104.1@36.22,34.577 36.27,34.577 36.709,34.138 36.709,33.898 36.723,33.884 Y100.3@37.059,33.884
24.576_OUT: R105.2 Y101.3 | length 1.4
  L1 (SIG/PWR) w0.152: R105.2@35.255,34.569 35.255,33.35 Y101.3@35.433,33.35
40MHz_IN: C308.1 CR300.1 L301.1 | length 2.5
  L1 (SIG/PWR) w0.152: L301.1@23.597,19.512 23.637,19.471 23.963,19.471 24.499,18.935 24.499,18.809 CR300.1@24.486,18.796 ; CR300.1@24.553,18.48 24.847,18.186 C308.1@25.607,18.186
40MHz_OUT: C310.1 CR300.3 U301.53 | length 5.8
  L1 (SIG/PWR) w0.152: U301.53@22.984,21.178 22.984,20.649 22.381,20.047 22.381,18.445 23.495,17.332 CR300.3@23.495,17.145 ; C310.1@23.266,16.205 23.266,16.906 CR300.3@23.505,17.145
+3V3_ANALOG: C102.2 C103.2 C104.2 C105.2 C109.2 C111.2 C126.2 C128.2 C129.2 C217.3 R222.2 R251.2 TP205.1 U100.8 U101.8 U102.8 U103.2 U204.10 Y100.4 Y101.4 | length 51.6
  L1 (SIG/PWR) w0.203: v1@42.799,37.414 42.778,37.394 42.778,29.942 44.774,27.946 45.052,27.946 45.06,27.939 47.463,27.939 47.871,28.346 47.93,28.346 51.638,32.055 v1(51.638,38.202) ; R222.2@43.35,21.082 45.245,21.082 45.499,20.828 R251.2@45.669,20.828 ; v1@46.677,29.413 v1@46.711,29.413
  L4 (PWR) w0.203: v1(36.99,29.171) 38.032,29.171 38.24,29.379 39.201,29.379 40.97,27.61 v1(40.97,25.4) 40.97,24.994 42.215,23.749 ; v1@44.68,21.206 v1(44.776,21.111) ; v1@44.719,21.245 42.215,23.749 ; v1(45.06,27.889) 45.009,27.838 45.009,27.305 45.225,27.089 45.555,27.089 ; v1@46.733,29.487 46.733,28.268 45.555,27.089 ; v1@46.812,26.619 46.812,26.594 46.393,26.175 44.64,26.175 ; 42.215,23.749 42.926,24.46 44.64,26.175 ; 44.64,26.175 45.085,26.619 45.555,27.089
  other v1: 41.319,24.692 46.838,26.619 46.733,29.47 42.778,37.419
+3V3_DAC: B100.1 B100.10 B100.12 B100.27 C112.2 C113.2 C114.2 C115.2 C116.2 C119.2 C120.2 C121.2 C231.3 R243.2 TP206.1 U206.10 | length 33.9
  L1 (SIG/PWR) w0.254: 35.382,44.12 35.382,45.136 TP206.1@36.474,46.228 ; TP206.1@36.551,46.152 37.023,46.625 ; 38.125,41.605 38.926,41.605 v1(39.802,42.481) ; R243.2@38.71,53.442 37.744,53.442 37.023,52.721 37.023,46.625 ; v1@39.827,42.469 40.153,42.794 v1(40.153,45.785) 39.126,46.812 37.211,46.812 37.023,46.625
  L4 (PWR) w0.254: v1(34.248,35.527) 34.892,35.527 36.5,37.135 36.5,39.179 v1@39.802,42.481 ; v1(40.153,45.785) 41.123,46.755 41.123,49.174 v1@41.148,49.2
  other v1: 36.525,37.135 41.123,49.149
+3V3_DIG: B100.13 C122.2 C139.2 C225.2 C227.2 C228.2 C229.2 C300.2 C301.2 C303.2 C304.2 C305.2 C306.2 C307.2 C407.2 C408.2 C409.2 ENC400.4 J400.7 J400.8 J400.35 J400.40 J400.41 J400.42 J401.4 L300.2 R118.2 R208.2 R209.2 R210.2 R211.2 R223.2 R236.2 R241.2 R242.2 R253.2 R300.2 R301.2 R405.2 R407.2 R414.2 R415.2 R416.2 R417.2 R418.2 R419.2 SW400.2 SW400.4 SW401.2 SW401.4 SW402.2 SW402.4 TP203.1 U205.6 U301.20 U301.46 U301.55 U301.56 | length 119.9
  L1 (SIG/PWR) w0.203: R242.2@33.866,50.648 33.866,50.598 33.68,50.412 33.68,45.921 ; 34.341,43.993 34.341,44.069 33.68,44.729 33.68,45.921 ; v1(34.421,45.144) 34.421,45.181 33.68,45.921
  L1 (SIG/PWR) w0.254: R253.2@2.565,43.104 2.591,43.129 3.226,43.129 3.607,42.748 5.652,42.748 ; v1(3.912,18.72) 3.959,18.767 3.959,18.853 4.479,19.373 J400.35@5.461,19.373 ; v1(15.038,17.332) 15.038,16.701 15.042,16.698 15.042,16.327 R210.2@15.113,16.256 ; C225.2@18.618,40.767 19.582,40.767 v1(20.18,41.365) ; v1(18.669,14.224) 18.736,14.224 19.142,13.818 R300.2@19.896,13.818 ; R236.2@20.498,39.802 20.283,39.802 20.213,39.872 20.213,41.331 v1(20.18,41.365) ; R209.2@20.71,1.727 20.732,1.748 20.732,2.698 v1@20.777,2.743 ; R241.2@21.438,34.188 21.844,34.595 21.844,40.894 21.373,41.365 v1(20.18,41.365) ; 32.156,20.853 32.969,21.666 R223.2@33.833,21.666
  L1 (SIG/PWR) w0.508: v1(27.387,21.059) 27.387,20.771 29.101,19.057 30.919,19.057 32.156,20.295 32.156,20.853 C304.2@30.607,22.403
  L4 (PWR) w0.254: v1(20.753,2.659) 21.573,3.48 30.785,3.48 32.918,1.346 34.468,1.346 36.297,3.175 ; 25.349,46.025 33.577,46.025 34.421,45.181 v1(34.421,45.144) ; ENC400.4@37.465,4.242 37.363,4.242 36.297,3.175 ; v1@38.989,2.667 38.98,2.667 38.472,3.175 36.297,3.175
  L6 (SIG/PWR) w0.203: v1(26.992,13.612) 30.228,13.612 32.309,11.532 36.413,11.532 37.023,10.922 R405.2@37.084,10.922 ; v1@39.091,2.634 39.784,3.328 R407.2@39.784,3.378
  L6 (SIG/PWR) w0.254: SW401.2@1.487,26.346 1.487,26.246 1.86,25.873 1.883,25.873 2.032,25.724 2.032,21.391 1.727,21.086 SW401.4@1.727,20.676 ; SW401.4@1.549,20.447 1.585,20.411 v1(1.585,19.595) ; v1(5.793,54.09) 5.86,54.09 6.395,53.555 SW402.4@8.147,53.555 ; SW402.4@8.222,53.58 8.742,53.061 13.126,53.061 13.247,53.182 13.406,53.182 SW402.2@13.64,53.416 ; v1(15.038,17.332) 16.773,17.332 19.177,19.736 21.717,19.736 21.925,19.944 22.042,19.944 22.149,20.051 R301.2@22.149,20.168 ; v1(16.156,54.344) 16.761,53.74 18.104,53.74 18.104,53.655 18.577,53.182 18.662,53.182 18.986,52.857 23.012,52.857 23.231,53.076 23.231,53.182 23.465,53.416 SW400.2@23.571,53.416 ; R419.2@16.35,29.632 R418.2@17.374,29.632 ; v1(17.295,28.831) 17.334,28.87 17.334,29.603 R418.2@17.374,29.642 ; R418.2@17.334,29.628 18.352,29.628 R415.2@18.415,29.566 ; v1(26.992,13.612) 26.992,13.546 27.182,13.356 27.182,12.848 27.085,12.751 R118.2@27.076,12.751
  other v1: 39.03,2.617 7.466,16.653 20.248,20.489 22.116,28.822 6.212,33.137 9.853,42.13 8.052,42.139 6.375,42.164
+3V9: C204.2 C211.2 C220.2 C232.2 L201.1 R200.2 R225.2 R244.2 R250.2 TP209.1 U200.6 U201.6 U204.1 U204.2 U206.1 U206.2 | length 53.8
  L1 (SIG/PWR) w0.254: 22.504,48.539 22.504,49.292 22.839,49.627 22.839,49.677 22.962,49.8 R250.2@23.012,49.8 ; 27.61,45.745 28.407,46.542 30.54,46.542 R200.2@30.582,46.584
  L4 (PWR) w0.254: v1(21.544,44.531) 28.57,44.531 28.981,44.12 40.488,44.12 ; v1(36.22,26.873) 35.56,27.534 35.56,31.925 40.488,36.853 40.488,44.12 ; v1(45.009,46.457) 45.009,45.364 43.764,44.12 40.488,44.12
  L6 (SIG/PWR) w0.381: v1(21.925,48.103) 21.925,48.569 23.724,50.368 24.874,50.368
+LED: C400.2 C413.2 J400.1 TP406.1 U400.6 | length 7.3
  L4 (PWR) w0.254: v1(5.766,37.313) 5.803,37.35 9.692,37.35 v1@12.04,35.002
  other v1: 12.054,34.988
-3V3: C108.2 C110.2 C125.2 C134.2 C135.2 C216.3 R220.2 R252.2 TP207.1 U100.4 U100.9 U101.4 U101.9 U102.4 U102.9 U103.4 U103.11 U203.11 U203.12 | length 76.4
  L4 (PWR) w0.254: v1@38.456,54.432 38.456,54.431 39.673,53.213 43.282,53.213 44.602,51.892 v1(44.602,49.632) 46.05,48.184 46.05,45.33 v1(45.451,44.731) 45.45,44.729 v1@45.415,44.729 ; 41.123,40.005 v1(41.123,42.367) ; 41.148,41.449 43.663,41.449 ; v1(44.12,32.106) 44.12,33.884 44.348,34.112 44.348,35.611 45.116,36.378 ; 45.745,32.055 45.745,32.588 ; 48.362,22.758 48.362,23.558 49.733,24.93 49.733,26.972 48.765,27.94 ; v1@48.743,26.721 48.765,26.744 48.765,27.94 ; 49.911,40.742 46.301,40.742 45.594,41.449 43.663,41.449 ; 43.663,41.449 43.663,37.831 45.116,36.378 ; 45.116,36.378 45.745,35.748 45.745,32.588 ; 45.745,32.588 46.558,32.588 48.765,30.381 48.765,27.94
  L6 (SIG/PWR) w0.254: R220.2@36.982,52.908 37.021,52.908 38.388,54.276 38.388,54.404 v1(38.435,54.451) ; C108.2@40.234,40.945 40.234,41.58 40.898,42.244 40.933,42.244 41.084,42.395 v1@41.084,42.43 ; v1(41.123,42.367) 41.998,42.367 42.455,41.91 44.78,41.91 45.898,43.028 ; v1@45.509,44.679 45.898,44.29 45.898,43.028 ; U101.4@49,40.241 49.877,40.241 50.343,39.776 U101.9@50.343,39.548 ; C110.2@49.04,41.596 49.04,41.646 48.917,41.769 48.655,41.769 47.396,43.028 45.898,43.028 ; C110.2@49.115,41.683 49.201,41.769 49.288,41.769 49.448,41.928 49.448,43.911 49.936,44.399 R252.2@49.936,45.583
  other v1: 48.765,26.727
-3V9: C205.2 C206.2 C218.2 L202.2 R201.2 R219.2 R249.2 TP208.1 U203.1 U203.2 | length 11.4
  L6 (SIG/PWR) w0.254: 27.153,43.998 27.153,43.518 27.369,43.302 27.419,43.302 27.542,43.179 R249.2@27.542,43.129 ; 31.267,45.441 32.283,45.441 34.061,47.219 38.811,47.219 39.395,47.803 ; R219.2@37.821,49.174 39.016,49.174
ADDR_DAC: B100.25 R135.1 | length 2.2
  L1 (SIG/PWR) w0.152: v1(32.614,37.186) 32.68,37.252 32.68,37.418 32.848,37.586 B100.25@33.452,37.586
  L6 (SIG/PWR) w0.152: v1(32.614,37.186) 32.614,37.092 32.75,36.955 32.75,36.361 32.865,36.246 R135.1@32.969,36.246
BAT+: C215.2 J200.1 TP210.1 U202.11 U202.12 | length 9
  L6 (SIG/PWR) w0.508: J200.1@3.964,10.79 4.129,10.624 4.438,10.624 TP210.1@6.045,9.017 ; TP210.1@6.005,8.977 7.794,7.188 C215.2@11.455,7.188
BOOT0: R301.1 R302.1 TP300.1 U301.5 | length 24.2
  L1 (SIG/PWR) w0.152: v1(24.258,22.649) 24.216,22.691 24.216,23.204 24.581,23.569 24.975,23.569 U301.5@25.009,23.603 ; v2@31.572,14.961 31.572,14.714 30.803,13.945 32.054,13.945 32.308,14.199 TP300.1@32.537,14.199
  L6 (SIG/PWR) w0.152: R301.1@23.165,20.117 23.165,20.167 24.265,21.267 24.265,22.642 v1(24.258,22.649) ; v1@24.292,22.615 24.292,23.481 25.652,24.841 28.042,24.841 29.413,23.47 29.413,17.12 v2@31.551,14.982
  other v2: 31.56,15.01
BOOT_BQ: C207.2 U202.21 | length 2.6
  L6 (SIG/PWR) w0.254: U202.21@16.413,6.27 16.569,6.27 16.635,6.336 18.626,6.336 18.84,6.121 v1(18.898,6.121)
CD_SD: J401.CD R419.1 U301.41 | length 18.2
  L1 (SIG/PWR) w0.152: v1(15.113,18.644) 15.18,18.71 15.434,18.71 17.348,20.625 17.348,21.986 17.731,22.369 18.125,22.369 U301.41@18.159,22.403
  L3 (SIG) w0.152: 11.481,29.947 11.481,29.872 13.868,27.484 13.868,19.888 v1(15.113,18.644)
CE_BQ: R221.2 U202.1 U301.47 | length 36.9
  L1 (SIG/PWR) w0.152: v1(17.551,0.864) 18.517,0.864 R221.2@18.618,0.762 ; U301.47@20.584,21.178 20.584,21.701 20.828,21.946 23.48,21.946 v1(23.495,21.93)
  L3 (SIG) w0.152: v1(17.551,0.864) 17.983,1.295 17.983,7.327 27.788,17.131 27.788,19.112 24.97,21.93 v1(23.495,21.93)
  L6 (SIG/PWR) w0.152: U202.1@15.728,4.085 15.728,2.179 17.043,0.864 v1(17.551,0.864)
CHIP_PU: C309.2 R300.1 SW300.3 SW300.4 TP301.1 U301.4 | length 25.5
  L1 (SIG/PWR) w0.152: TP301.1@18.11,15.138 18.148,15.176 20.256,15.176 v1(20.295,15.138) 20.341,15.092 20.62,15.092 21.819,13.894 21.819,12.649 ; SW300.4@19.591,12.657 21.006,12.657 ; R300.1@21.006,13.64 21.006,12.657 ; SW300.3@23.741,12.657 21.006,12.657 ; U301.4@25.009,23.203 25.043,23.236 26.386,23.236 v1(26.924,23.774) 27.018,23.774 27.094,23.851 C309.2@28.219,23.851
  L6 (SIG/PWR) w0.152: v1(20.295,15.138) 20.295,15.723 24.968,20.396 24.968,21.819 v1(26.924,23.774)
CLK_SD: D401.4 J401.5 R307.2 | length 20.5
  L1 (SIG/PWR) w0.152: v1(16.06,18.109) 16.126,18.176 16.126,18.412 R307.2@17.482,19.768
  L3 (SIG) w0.152: v1(10.322,29.036) 10.322,30.261 11.24,31.179 12.306,31.179 14.63,28.854 14.63,24.613 15.769,23.474 15.769,18.494 16.06,18.203 v1(16.06,18.109)
CMD_SD: D401.5 J401.3 R414.1 U301.43 | length 17.4
  L1 (SIG/PWR) w0.152: U301.43@18.984,21.178 18.984,22.014 19.075,22.106 v1(19.075,22.2)
  L3 (SIG) w0.152: 16.561,35.077 16.561,24.653 19.014,22.2 v1(19.075,22.2)
  L3 (SIG) w0.203: 16.281,37.338 16.281,37.258 16.561,36.978 16.561,35.077
CS_LCD: J400.38 R413.2 U301.39 | length 15.4
  L1 (SIG/PWR) w0.152: J400.38@5.64,17.883 7.856,17.883 8.139,18.166 8.204,18.23 R413.2@8.204,18.385 ; R413.2@8.314,18.39 8.314,18.44 8.488,18.613 8.538,18.613 9.152,19.228 14.986,19.228 16.84,21.082 16.84,22.301 17.708,23.169 18.125,23.169 U301.39@18.159,23.203
D/CX_LCD: J400.36 TP404.1 U301.37 | length 14.6
  L1 (SIG/PWR) w0.152: J400.36@5.74,18.923 5.78,18.883 5.798,18.901 6.226,18.901 8.661,21.336 14.605,21.336 17.238,23.969 18.125,23.969 U301.37@18.159,24.003
DACL: B100.8 C107.2 R103.1 U101.6 | length 21.6
  L1 (SIG/PWR) w0.152: B100.8@36.452,40.386 42.062,40.386 42.709,41.032 v1@54.088,41.032
  L6 (SIG/PWR) w0.152: U101.6@51.7,39.741 52.543,39.741 52.807,40.005 C107.2@52.807,40.234 ; C107.2@52.937,40.186 53.11,40.013 54.084,40.013 R103.1@54.127,40.056 ; v1@54.077,41.021 54.156,40.941 R103.1@54.156,40.056
  other v1: 54.108,41.032
DACLB: B100.9 C101.2 R101.1 U101.2 | length 16.6
  L1 (SIG/PWR) w0.152: B100.9@36.452,40.786 40.76,40.786 41.58,41.605 46.388,41.605 46.54,41.758 v1(46.634,41.758)
  L6 (SIG/PWR) w0.152: R101.1@46.536,38.54 46.507,38.568 46.507,41.536 46.634,41.663 v1(46.634,41.758) ; R101.1@46.66,38.506 46.66,38.613 46.937,38.89 47.679,38.89 48.307,38.89 48.609,39.192 48.997,39.192 U101.2@49.022,39.218
DACR: B100.3 C100.2 R100.1 U100.2 | length 4.4
  L1 (SIG/PWR) w0.152: B100.3@36.452,38.386 37.263,38.386 37.668,38.791 v1@37.668,38.862
  L6 (SIG/PWR) w0.152: v1@37.694,38.76 37.735,38.719 R100.1@37.735,38.012 38.554,38.012 38.71,38.168 C100.2@38.71,38.227 ; C100.2@38.878,38.312 38.97,38.405 U100.2@39.878,38.405
  other v1: 37.725,38.848
DACRB: B100.2 C106.2 R102.1 U100.6 | length 13.5
  L1 (SIG/PWR) w0.152: B100.2@36.452,37.986 42.482,37.986 44.755,40.259 v1(45.314,40.259)
  L6 (SIG/PWR) w0.152: U100.6@42.772,38.927 43.555,38.927 44.075,39.446 44.094,39.446 C106.2@44.161,39.513 ; C106.2@44.171,39.472 44.301,39.341 R102.1@45.279,39.341 45.314,39.376 v1(45.314,40.259)
DAT0_SD: D401.2 J401.7 R415.1 U301.40 | length 9.9
  L1 (SIG/PWR) w0.152: U301.40@18.159,22.803 18.167,22.811 18.747,22.811 18.947,23.011 18.947,23.344 v1(19.014,23.41)
  L3 (SIG) w0.152: v1(18.711,31.394) 18.161,30.844 18.161,24.288 19.014,23.436 v1(19.014,23.41)
DATA1_DAC: B100.19 TP100.1 U301.16 | length 19
  L1 (SIG/PWR) w0.152: U301.16@23.784,28.028 23.818,28.061 23.818,28.363 23.82,28.366 23.82,28.458 24.115,28.753 24.509,28.753 25.07,29.314 25.07,36.373 26.416,37.719 26.545,37.719 26.996,38.17 26.996,38.403 28.578,39.986 B100.19@33.319,39.986
DATA2_DAC: B100.18 TP101.1 U301.17 | length 19.8
  L1 (SIG/PWR) w0.152: U301.17@23.384,28.028 23.415,28.059 23.415,28.571 24.13,29.286 24.13,36.551 TP101.1@26.746,39.167 ; TP101.1@26.67,39.243 27.789,40.362 33.428,40.362 B100.18@33.452,40.386
DATA_CLK_DAC: B100.20 TP102.1 U301.15 | length 17.8
  L1 (SIG/PWR) w0.152: U301.15@24.184,28.028 24.649,28.028 26.035,29.413 26.035,35.865 26.784,36.614 29.756,39.586 B100.20@33.452,39.586
DVDD: B100.15 C117.2
EN1_BQ: R209.1 U202.2 | length 8.2
  L1 (SIG/PWR) w0.152: v1(15.646,0.584) 15.693,0.631 16.125,0.631 17.221,1.727 R209.1@19.66,1.727
  L6 (SIG/PWR) w0.152: U202.2@15.228,4.085 15.228,1.003 v1(15.646,0.584)
EN2_BQ: R216.2 U202.3 | length 3.5
  L1 (SIG/PWR) w0.152: R216.2@14.292,0.711 14.447,0.866 v1@14.447,1.524
  L6 (SIG/PWR) w0.152: v1(14.428,1.599) 14.428,1.606 14.684,1.862 14.684,4.041 U202.3@14.728,4.085
EN_DAC_LDO+: R244.1 R247.2 U206.3
EN_LDO+: R225.1 R231.2 U204.3
ENC_A_1: D400.5 ENC400.1 R400.1 R405.1 | length 10.4
  L6 (SIG/PWR) w0.203: ENC400.1@37.465,1.843 38.827,3.206 38.827,4.703 38.681,4.849 38.587,4.849 38.278,5.158 38.278,7.468 38.776,7.965 38.776,9.078 38.215,9.639 38.215,9.834 R400.1@38.147,9.902 ; R405.1@38.049,10.846 38.058,10.837 38.058,9.897 R400.1@38.1,9.855
ENC_B_1: D400.2 ENC400.3 R407.1 R408.2 | length 9.2
  L6 (SIG/PWR) w0.203: D400.2@40.335,4.521 40.351,4.506 40.351,3.812 40.586,3.577 40.636,3.577 40.772,3.441 R407.1@40.772,3.391 ; R407.1@40.784,3.378 41.891,3.378 42.145,3.124 43.104,3.124 43.84,3.861 43.84,4.87 43.078,5.632 R408.2@43.078,5.69 ; R407.1@40.792,3.32 42.269,1.843 ENC400.3@42.465,1.843
FB_BB_3.3: C225.1 C226.1 R236.1 R240.2 U205.9
FB_BB_3.9: R200.1 R212.2 R213.2 U200.9 | length 2.3
  L1 (SIG/PWR) w0.203: U200.9@29.024,44.451 29.075,44.502 29.075,44.994 29.623,45.542 30.485,45.542 30.556,45.614 R200.1@30.556,45.618
GND: B100.11 B100.14 B100.22 B100.30 B100.31 C102.1 C103.1 C104.1 C105.1 C108.1 C109.1 C110.1 C111.1 C112.1 C113.1 C114.1 C115.1 C116.1 C117.1 C119.1 C120.1 C121.1 C122.1 C125.1 C126.1 C127.1 C128.1 C129.1 C130.1 C131.1 C132.2 C133.1 C134.1 C135.1 C136.1 C137.2 C139.1 C200.1 C202.1 C203.1 C204.1 C206.1 C208.1 C209.1 C210.1 C211.1 C213.1 C214.1 C215.1 C216.2 C217.2 C218.1 C219.1 C220.1 C221.1 C224.1 C227.1 C228.1 C229.1 C230.1 C231.2 C232.1 C234.1 C300.1 C301.1 C302.1 C303.1 C304.1 C305.1 C306.1 C307.1 C308.2 C309.1 C310.2 C311.1 C312.1 C400.1 C404.1 C405.1 C407.1 C408.1 C409.1 C412.1 C413.1 CR300.2 CR300.4 D100.1 D201.A D202.3 D203.3 D205.A D206.C D207.C D208.A D209.C D400.3 D400.8 D401.3 D401.8 D402.A D403.A D404.A ENC400.2 J100.1 J100.SH1 J100.SH2 J100.SH3 J200.2 J200.4 J200.5 J201.A1 J201.A12 J201.B1 J201.B12 J201.S1 J201.S2 J201.S3 J201.S4 J400.11 J400.12 J400.13 J400.14 J400.15 J400.16 J400.17 J400.18 J400.19 J400.20 J400.21 J400.22 J400.23 J400.24 J400.25 J400.26 J400.27 J400.28 J400.29 J400.30 J400.31 J400.32 J400.43 J400.48 J400.49 J400.50 J401.6 J401.G1 J401.G2 J401.G3 J401.G4 Q400.2 R106.1 R107.1 R108.1 R111.1 R112.1 R113.1 R126.1 R129.1 R133.1 R135.2 R205.1 R207.1 R212.1 R215.1 R216.1 R217.1 R218.1 R221.1 R224.1 R226.1 R228.1 R229.1 R230.1 R231.1 R234.1 R235.1 R239.1 R240.1 R245.1 R246.1 R247.1 R303.1 R401.1 R402.1 R403.1 R404.1 R406.1 R412.1 R413.1 R422.1 R424.1 R425.1 SW300.1 SW300.2 SW301.3 SW301.4 TP211.1 TP212.1 TP213.1 TP214.1 TP215.1 TP216.1 TP217.1 TP218.1 TP219.1 TP220.1 TP221.1 TP222.1 U100.3 U100.5 U101.3 U101.5 U103.3 U200.2 U200.5 U201.2 U202.4 U202.15 U202.16 U202.25 U203.9 U203.13 U204.8 U204.11 U205.2 U205.5 U206.8 U206.11 U300.4 U300.9 U301.57 U400.12 U400.17 Y100.2 Y101.2 | length 74.5
  L1 (SIG/PWR) w0.203: U400.12@8.89,36.855 8.89,36.17 9.271,35.789 U400.17@9.271,35.763 ; C307.1@22.094,29.928 C307.1@22.098,29.932 ; SW300.1@23.741,10.507 SW300.1@23.941,10.507 ; D203.3@25.198,8.103 25.296,8.201 25.296,9.04 26.801,10.545 27.614,10.545 v3@27.788,10.719 ; v1@28.499,9.474 v1(28.499,9.449) 28.932,9.016 28.932,8.41 R235.1@29.01,8.331 ; C309.1@29.305,23.781 29.305,23.724 29.376,23.652 29.434,23.652 29.668,23.418 30.569,23.418 v1(30.626,23.361) ; SW301.3@29.421,10.634 35.128,10.634 v2@35.128,10.846 ; B100.22@33.452,38.786 34.352,38.786 ccw(c34.352,39.386) B100.31@34.952,39.386 ; v2(34.493,32.442) 34.536,32.442 35.441,31.537 Y101.2@35.541,31.537 35.664,31.415 35.664,30.304 ; v1(34.519,40.818) 34.552,40.851 B100.14@34.552,41.886 ; R107.1@34.688,30.302 34.689,30.303 35.663,30.303 35.664,30.304 ; B100.31@35.687,41.097 35.752,41.097 B100.11@35.752,41.886 ; B100.31@35.717,37.617 35.746,37.588 35.746,37.474 35.752,37.469 B100.30@35.752,36.886 ; v1(36.119,30.328) 36.095,30.304 35.664,30.304 ; R231.1@37.186,20.701 37.189,20.697 37.189,19.944 v1(37.193,19.94) ; v1(37.287,35.458) v1(37.287,35.458) ; Y100.2@38.483,33.524 38.483,33.574 38.782,33.872 39.384,33.872 v1(39.397,33.885) 39.422,33.861 39.422,33.054 R106.1@39.446,33.029 ; U204.11@40.03,23.266 40.056,23.241 U204.8@41.405,23.241 ; D207.C@47.308,19.507 49.066,19.507 50.362,20.803 v1@50.394,20.803
  L1 (SIG/PWR) w0.254: v1@22.936,19.025 22.94,19.028 23.005,19.028 23.503,18.53 CR300.4@23.503,18.48 ; C310.2@24.098,16.027 24.098,15.977 24.584,15.491 24.821,15.491 24.841,15.472 v1@24.841,15.469 ; CR300.2@24.553,17.13 24.553,17.08 24.801,16.832 24.851,16.832 25.171,16.513 v1@25.171,16.129 ; C308.2@25.654,17.355 25.654,16.831 25.734,16.751 25.734,16.692 v1@25.73,16.688 ; C103.1@37.613,30.734 38.684,30.734 38.786,30.632 ; C102.1@38.041,29.845 38.041,29.92 38.139,30.018 38.171,30.018 38.786,30.632 ; v1@39.473,31.164 39.359,31.164 39.283,31.088 39.242,31.088 38.786,30.632 ; TP216.1@51.435,27.661 51.457,27.639 52.606,27.639 v2(52.628,27.617)
  L6 (SIG/PWR) w0.203: U202.4@14.228,4.085 14.228,4.851 U202.25@14.249,4.851 ; U202.15@14.228,7.955 14.228,7.184 U202.25@14.249,7.163 ; U202.16@14.728,7.955 14.728,7.218 U202.25@14.757,7.188 ; C408.1@18.713,37.16 C408.1@18.764,37.109 ; D202.3@26.455,0.737 26.553,0.835 26.553,1.179 26.568,1.193 28.321,1.193 v3@28.397,1.27 ; R234.1@28.372,2.689 28.408,2.653 28.408,1.234 v3@28.499,1.143 ; 31.852,31.42 31.953,31.521 31.953,34.196 32.745,34.989 32.745,35.039 32.894,35.187 R135.2@32.944,35.187 ; v1(36.906,28.499) 37.587,28.499 37.587,28.64 37.694,28.746 C130.1@37.694,28.804 ; v1@37.465,45.136 37.571,45.03 v1@37.58,45.03 ; v1(38.684,32.563) 39.53,32.563 R133.1@39.632,32.461 ; v1@39.065,44.958 v1@39.097,44.99 ; v1(39.303,39.26) 39.613,38.95 40.048,38.95 U100.3@40.072,38.927 ; v1@39.421,33.782 v1@39.421,33.833 ; C108.1@41.055,40.764 41.129,40.837 41.621,40.837 v1(41.677,40.894) ; R412.1@41.064,9.804 41.064,9.854 41.504,10.294 v2@41.504,10.338 ; v1(41.3,36.627) 41.315,36.612 41.924,36.612 C109.1@41.935,36.601 ; R230.1@41.766,53.67 R230.1@41.847,53.589 ; v1(41.961,32.385) 42.015,32.331 42.654,32.331 C137.2@42.708,32.277 ; U100.5@42.772,39.427 42.773,39.428 42.773,39.928 v1(42.774,39.929) ; C136.1@42.835,33.858 42.835,34.041 43.083,34.29 v1@43.688,34.29 ; C405.1@43.002,6.731 43.063,6.792 43.76,6.792 v2(43.775,6.777) ; v1(44.958,33.63) 44.971,33.617 44.971,32.88 C125.1@44.983,32.868 ; v1(45.085,28.677) 45.641,28.677 45.644,28.674 C126.1@45.644,28.626 ; v1(45.288,24.816) C129.1@45.288,25.603 ; v1(45.542,24.333) 45.671,24.333 45.771,24.433 46.136,24.433 46.177,24.475 C128.1@46.177,24.511 ; v1@46.221,17.374 46.262,17.333 47.012,17.333 C133.1@47.022,17.323 ; v1(47.015,33.045) 47.031,33.029 47.578,33.029 C132.2@47.616,33.067 ; C133.1@47.153,17.435 47.153,18.316 R108.1@47.176,18.339 ; U103.3@47.804,23.473 v1@47.804,24.51 ; v1(48.285,39.776) 48.303,39.759 48.811,39.759 U101.3@48.844,39.726 ; D100.1@48.438,10.285 v1(48.438,10.947) ; C134.1@49.422,24.638 49.422,24.577 49.533,24.466 50.083,24.466 v1(50.14,24.409) ; C110.1@49.965,41.596 50.015,41.645 50.015,42.395 v1@50.14,42.52 ; v1(50.038,37.389) 50.051,37.376 50.717,37.376 C111.1@50.727,37.386 ; C135.1@50.444,25.552 50.531,25.466 v1(50.531,24.875) ; v1(50.8,33.934) 50.809,33.926 50.809,33.181 R126.1@50.817,33.172 ; v1(51.613,41.554) 51.613,41.474 51.7,41.387 U101.5@51.7,40.241 ; R129.1@52.113,13.157 52.163,13.107 53.238,13.107 J100.1@53.391,12.954 ; C127.1@52.721,30.455 52.747,30.429 v1(53.594,30.429)
  L6 (SIG/PWR) w0.254: U300.9@10.109,21.805 U300.9@10.109,21.819 ; v1(46.787,35.001) 47.468,35.001 47.574,34.895 C131.1@47.574,34.773